# Altium PCB NB3000XN.PcbDoc (part 45 of 71)
Units mil, origin at the board's own origin, x right, y up, seen from the top; angles counter-clockwise.
Board outline 9527.56 x 6929.77 mil, 6 copper layers (Top Layer, GND+SHIELD, MidLayer1, MidLayer2, P2 - 3V3+5V0, Bottom Layer), stack 62.375 mil thick; 832 components, 1027 nets, 4655 pads, 4981 vias.
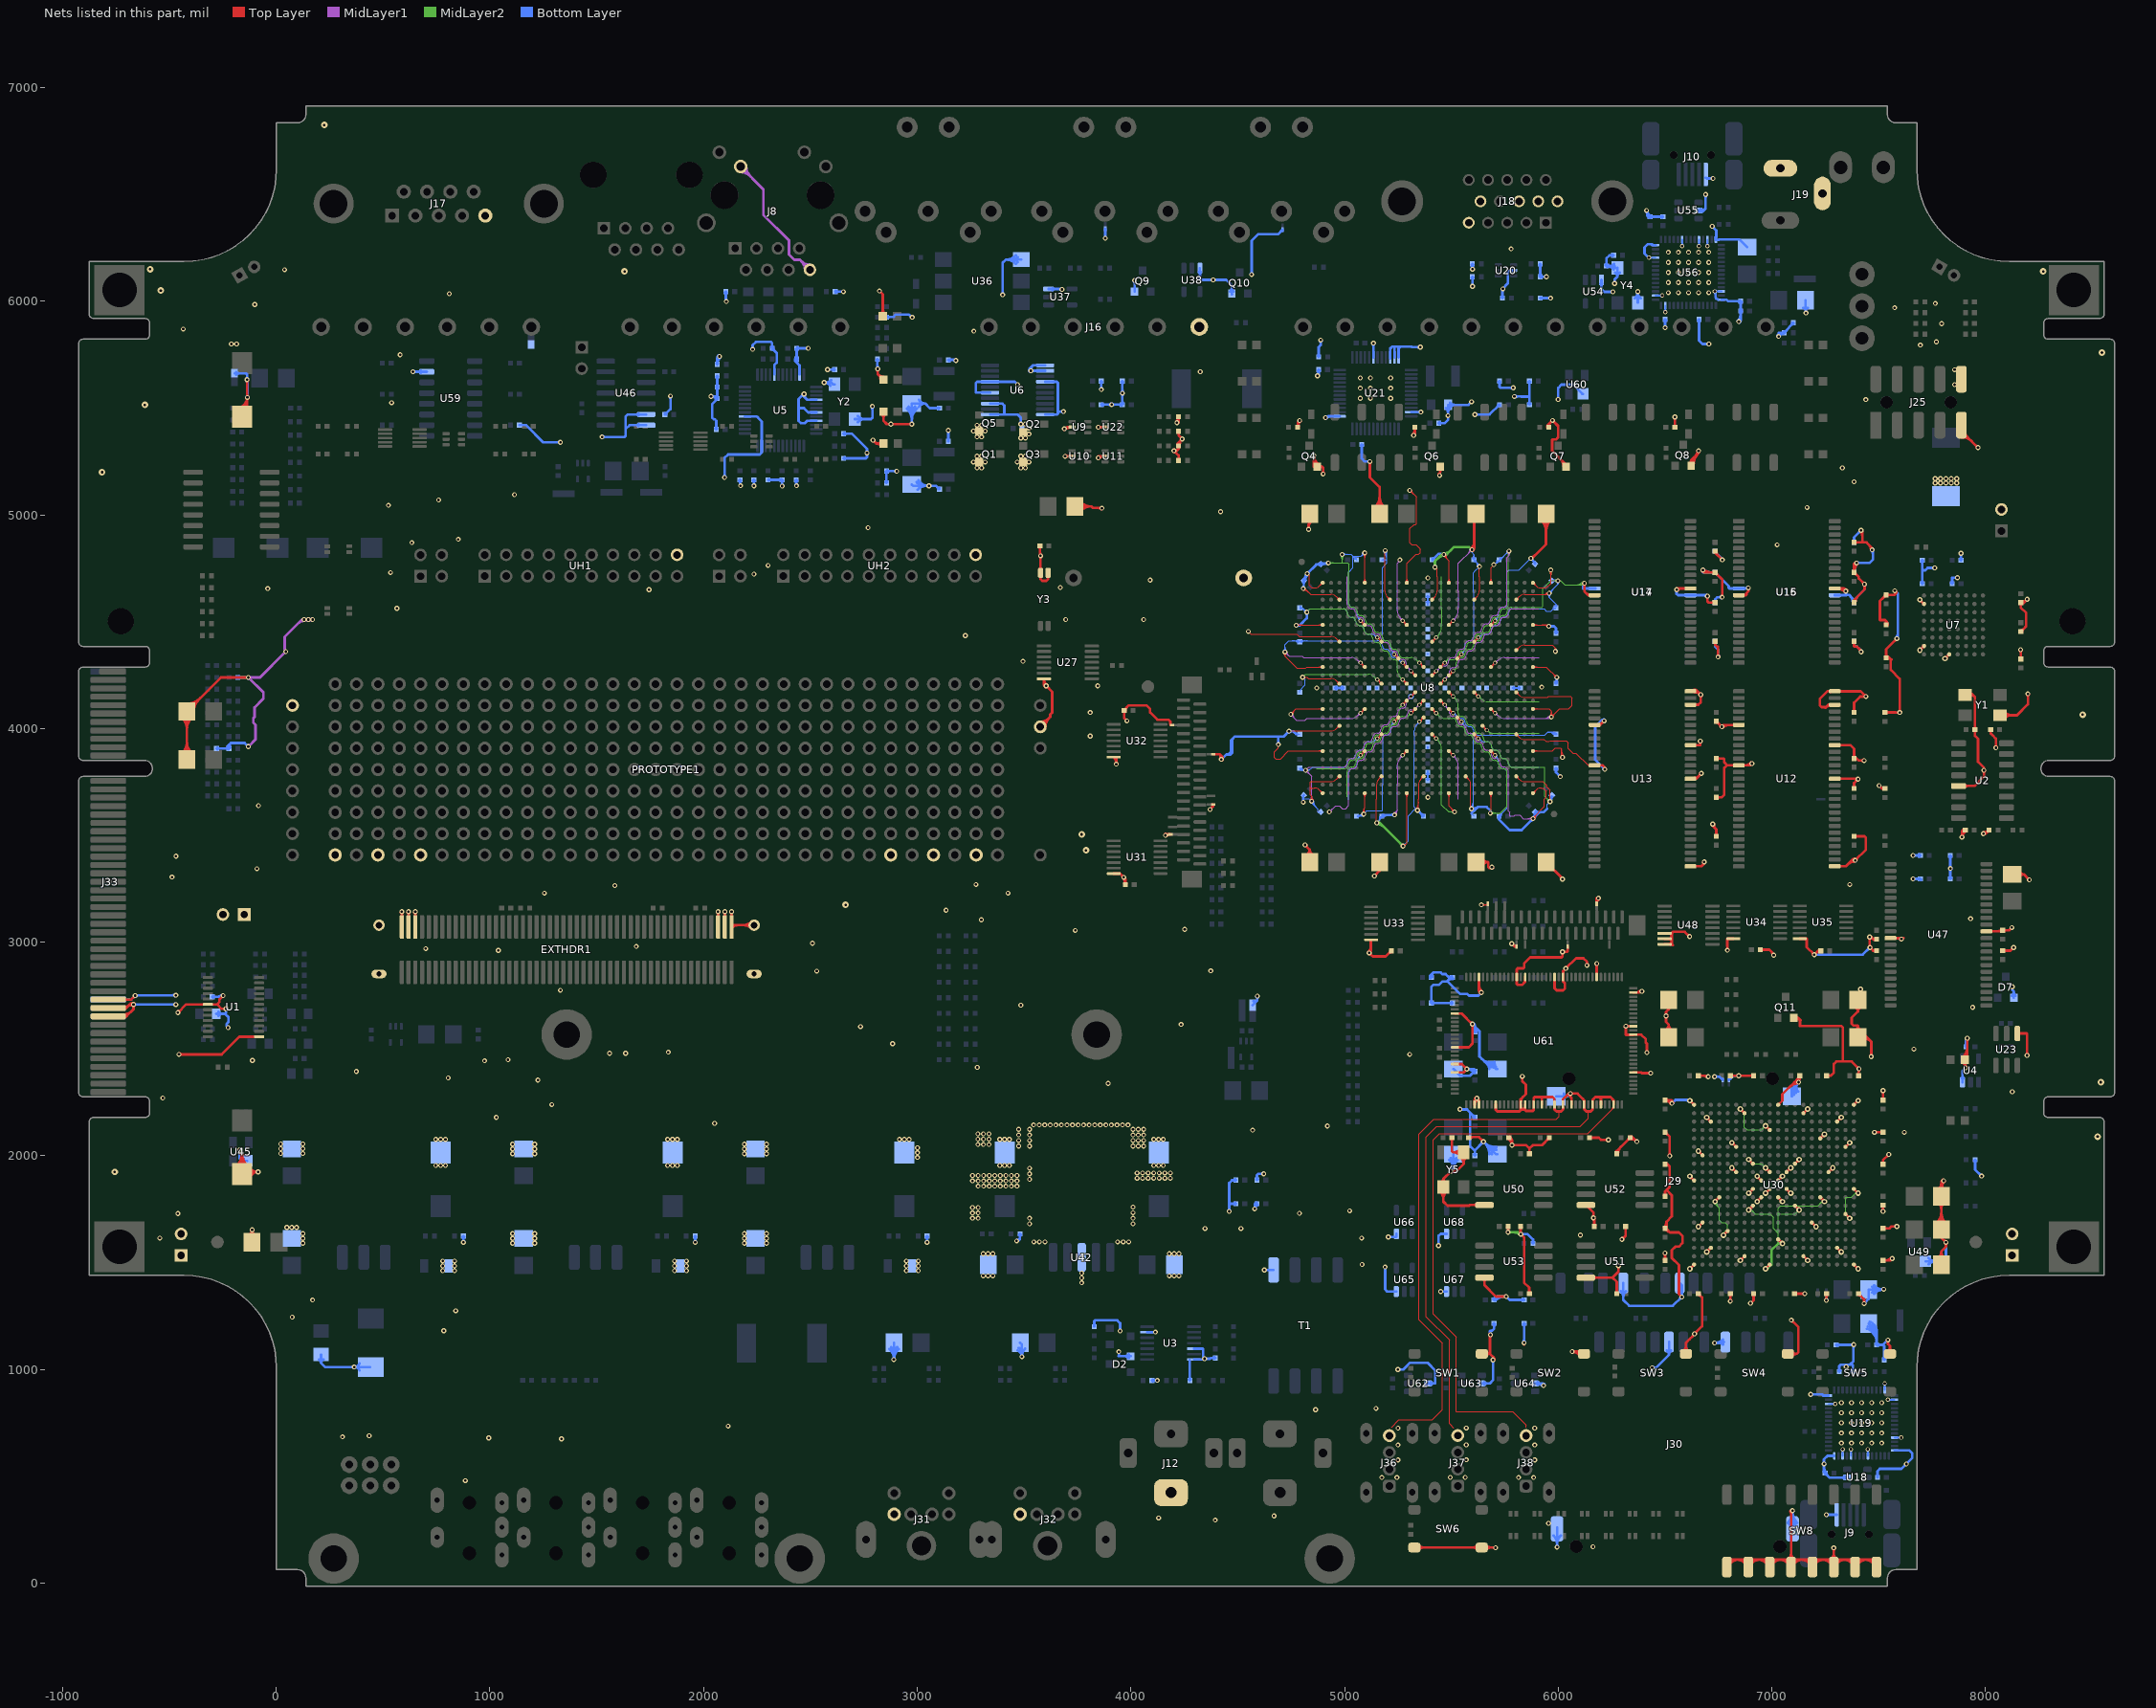
[diagram p49: the nets of this part, all layers, seen from the top]

## Via types
v1: diameter 23, hole 11.81, Top Layer to Bottom Layer, 3672 vias
v2: diameter 26, hole 11.81, Top Layer to Bottom Layer, 461 vias
v3: diameter 19, hole 11.81, Top Layer to Bottom Layer, tented both sides, 396 vias
v4: diameter 23.62, hole 11.81, Top Layer to Bottom Layer, 288 vias
v5: diameter 20, hole 11.81, Top Layer to Bottom Layer, 91 vias
v6: diameter 23, hole 11.81, Top Layer to Bottom Layer, tented both sides, 50 vias
v7: diameter 31, hole 11.81, Top Layer to Bottom Layer, 15 vias
v8: diameter 27.56, hole 11.81, Top Layer to Bottom Layer, tented both sides, 4 vias
v9: diameter 29, hole 11.81, Top Layer to Bottom Layer, 3 vias
v10: diameter 21, hole 11.81, Top Layer to Bottom Layer, 1 vias

## Nets (pads, with @x,y where several pads share a name; then routed paths per layer and width w, separated by ;. In a path a pad name is that pad's centre, name@x,y a point inside that pad or via, vN(x,y) a via of type N, cw(c..) or ccw(c..) an arc to the next point about the centre after c; other vN are vias at no path point) (continued)
GND: (continued)
  Bottom Layer w12: J33.B38@-785.98,2731.6 -678.25,2731.6 v1(-659.81,2750.04) -658.04,2751.81 v1(-470,2751.81) ; J33.B38@-711.58,2726.1 cw(c-698.3,2712.82) -698.3,2731.6 cw(c-698.3,2750.38) J33.B38@-711.58,2737.1 ; v1(-668.14,2708.37) -667.96,2708.19 v1(-470,2708.19) ; v1@-665.31,2750.04 cw(c-678.59,2750.04) -669.2,2740.65 cw(c-659.81,2731.26) v1@-659.81,2744.54 ; v1@-664.25,2704.49 cw(c-655.31,2695.55) -655.31,2708.19 ; v1@-664.25,2712.26 ccw(c-654.42,2722.1) -654.42,2708.19 ; v1@-655.92,2746.15 cw(c-642.26,2732.49) -642.26,2751.81 ; v1@-473.89,2704.3 ccw(c-483.28,2694.91) -483.28,2708.19 ccw(c-483.28,2721.47) v1@-473.89,2712.08 ; v1@-473.89,2747.92 ccw(c-483.28,2738.53) -483.28,2751.81 ccw(c-483.28,2765.09) v1@-473.89,2755.7 ; C21.2@-299.33,2745 -263.81,2745 -259.81,2749 -258.81,2750.04 v1(-248.48,2750.04) ; C21.2@-295.22,2740.89 cw(c-285.3,2730.97) -285.3,2745 ; C21.2@-295.22,2749.11 ccw(c-285.3,2759.03) -285.3,2745 ; C20.2@-280.63,2665 -239.81,2665 ; C13.2@-279.33,3906.82 C7.2@-220.67,3906.82 -220.67,3924.33 -212.63,3932.37 ; C13.2@-275.22,3902.71 cw(c-265.3,3892.79) -265.3,3906.82 ; C13.2@-275.22,3910.93 ccw(c-265.3,3920.85) -265.3,3906.82 ; -273.92,2745 ccw(c-273.92,2775.49) v1@-252.36,2753.93 ; C20.2@-270.95,2655.32 cw(c-247.59,2631.96) -247.59,2665 cw(c-247.59,2698.04) C20.2@-270.95,2674.68 ; v1@-238.36,2684.49 cw(c-247.75,2675.1) -234.48,2675.1 cw(c-221.2,2675.1) v1@-230.59,2684.49 ; v1(-234.48,2688.37) -234.48,2670.33 -239.81,2665 ; C7.2@-226.03,3903.73 cw(c-213.41,3910.99) -223.71,3921.29 ; v1(-225,2600) -233,2608 -233,2616.59 ; C7.2@-224.78,3902.71 ccw(c-234.7,3892.79) -234.7,3906.82 ccw(c-234.7,3920.85) -224.78,3910.93 ccw(c-234.7,3920.85) -220.67,3920.85 ccw(c-206.64,3920.85) C7.2@-216.56,3910.93 ; v1@-223.88,2605.38 cw(c-221.55,2616.59) -233,2616.59 ; C7.2@-215.63,3909.71 cw(c-199.33,3919.08) -212.63,3932.37 ; NT1.2@-194.76,5662.8 -142.79,5662.79 -136.48,5656.48 v1(-136.48,5633.37) -134.81,5631.71 v1(-134.81,5550.04) ; NT1.2@-187.87,5655.9 cw(c-171.23,5639.26) -171.23,5662.79 cw(c-171.23,5686.33) NT1.2@-187.87,5669.69 ; C18.2@-179.33,4239.55 -130.65,4239.54 v1(-130.48,4239.37) ; C18.2@-175.22,4235.44 cw(c-165.3,4225.52) -165.3,4239.54 ; C18.2@-175.22,4243.65 ccw(c-165.3,4253.57) -165.3,4239.54 ; v1(-171.14,2028.04) -171.14,1986.14 -161.69,1976.69 U45.1@-135.93,1976.69 ; -144.16,4239.54 cw(c-144.16,4225.69) v1@-134.36,4235.49 ; -143.34,4239.54 ccw(c-143.34,4252.24) v1@-134.36,4243.26 ; v1@-140.36,5629.49 cw(c-153.78,5616.07) -134.81,5616.07 ; v1@-140.36,5637.26 ccw(c-149.75,5646.65) -136.48,5646.65 ccw(c-123.2,5646.65) v1@-132.59,5637.26 ; v1@-138.7,5553.93 ccw(c-148.09,5563.32) -134.81,5563.32 ccw(c-121.53,5563.32) v1@-130.92,5553.93 ; v1@-135.98,3915.37 ccw(c-149.25,3915.37) -139.86,3924.76 ccw(c-130.48,3934.15) v1@-130.48,3920.87 ; v1(-130.48,3915.37) -147.48,3932.37 -212.63,3932.37 ; R111.2@199.3,1046.74 cw(c191.56,1030) 210,1030 ; R111.2@210,1069.88 210,1030 ; R111.2@220.7,1046.74 ccw(c228.44,1030) 210,1030 ; v1@361.3,1007.82 ccw(c351.91,998.43) 351.91,1011.71 ccw(c351.91,1024.99) v1@361.3,1015.6 ; v1@369.08,1007.82 cw(c378.72,998.18) 378.72,1011.81 ; v1@369.08,1015.6 ccw(c378.22,1024.74) 378.22,1011.81 ; C87.2@390.77,995.28 ccw(c365.19,983.76) v1@365.19,1011.81 ; C87.2@390.77,1028.34 cw(c365.19,1039.86) v1@365.19,1011.81 ; C87.2@439.24,1011.81 v1@365.19,1011.81 ; v4(639.92,5670.08) U59.15@704.59,5670.08 ; v4@644.03,5665.97 cw(c653.95,5656.05) 653.95,5670.08 cw(c653.95,5684.11) v4@644.03,5674.19 ; U59.15@677.44,5664.58 ccw(c664.16,5651.3) 664.16,5670.08 ccw(c664.16,5688.86) U59.15@677.44,5675.58 ; v1@872.29,1599.08 ccw(c862.9,1608.47) 876.18,1608.47 ccw(c889.46,1608.47) v1@880.07,1599.08 ; R206.2@872.42,1620.75 cw(c863.34,1611.67) 876.18,1611.67 cw(c889.02,1611.67) R206.2@879.94,1620.75 ; v1(876.18,1595.19) R206.2@876.18,1625 ; C151.2@1137.78,5420.08 1169.92,5420.08 1250,5340 v1(1330,5340) ; v1@1326.11,5336.11 ccw(c1316.72,5326.72) 1316.72,5340 ccw(c1316.72,5353.28) v1@1326.11,5343.89 ; v1(1525,5365) 1630,5365 1635,5370 1635,5401.16 ; v1@1528.89,5361.11 cw(c1538.28,5351.72) 1538.28,5365 cw(c1538.28,5378.28) v1@1528.89,5368.89 ; U46.7@1695.94,5415.97 ccw(c1686.02,5406.05) 1686.02,5420.08 ccw(c1686.02,5434.11) U46.7@1695.94,5424.19 ; U46.6@1695.94,5465.97 ccw(c1686.02,5456.05) 1686.02,5470.08 ccw(c1686.02,5484.11) U46.6@1695.94,5474.19 ; U46.7@1731.54,5420.08 1653.92,5420.08 1635,5401.16 ; U46.6@1731.54,5470.08 1645.08,5470.08 1635,5460 1635,5401.16 ; C152.1@1819.33,5470 1845.19,5495.86 v1(1845.19,5556.71) ; C152.1@1819.33,5475.81 ccw(c1819.33,5489.84) 1829.25,5479.92 ccw(c1839.17,5470) C152.1@1825.14,5470 ; v1@1841.3,5552.82 cw(c1831.91,5543.43) 1845.19,5543.43 cw(c1858.47,5543.43) v1@1849.08,5552.82 ; v1@1957.29,1598.89 ccw(c1947.9,1608.28) 1961.18,1608.28 ccw(c1974.46,1608.28) v1@1965.07,1598.89 ; R204.2@1957.42,1620.75 cw(c1948.34,1611.67) 1961.18,1611.67 cw(c1974.02,1611.67) R204.2@1964.94,1620.75 ; v1(1961.18,1595) R204.2@1961.18,1625 ; v1@2038.89,5551.11 cw(c2048.28,5541.72) 2048.28,5555 cw(c2048.28,5568.28) v1@2038.89,5558.89 ; 2052.94,5531.08 ccw(c2039.51,5544.51) R52.2@2058.5,5544.51 ; C50.1@2055.22,5404.11 ccw(c2045.3,5414.03) 2059.33,5414.03 ccw(c2073.36,5414.03) C50.1@2063.44,5404.11 ; C50.1@2059.33,5400 2059.33,5440.37 2052,5447.71 2048.52,5447.71 2040.19,5456.04 2040.19,5518.33 2063.82,5541.96 R52.2@2063.82,5545 ; R52.2@2059.49,5542.4 ccw(c2035,5524.9) v1(2035,5555) 2053.82,5555 R52.2@2063.82,5545 ; R52.2@2060.06,5549.25 ccw(c2050.98,5558.33) 2063.82,5558.33 ccw(c2076.66,5558.33) R52.2@2067.58,5549.25 ; R51.2@2060.06,5594.08 cw(c2050.98,5585) 2063.82,5585 ; R51.2@2060.06,5602.59 ccw(c2050.98,5611.67) 2063.82,5611.67 ccw(c2076.66,5611.67) R51.2@2067.58,5602.59 ; R47.2@2060.06,5647.41 cw(c2050.98,5638.33) 2063.82,5638.33 cw(c2076.66,5638.33) R47.2@2067.58,5647.41 ; R46.2@2060.06,5709.25 ccw(c2050.98,5718.33) 2063.82,5718.33 ccw(c2076.66,5718.33) R46.2@2067.58,5709.25 ; 2063.82,5585 cw(c2076.66,5585) R51.2@2067.58,5594.08 ; R47.2@2063.82,5651.67 R51.2@2063.82,5598.33 R52.2@2063.82,5545 ; R46.2@2063.82,5703.47 cw(c2111.53,5703.47) v1@2078.35,5737.76 ; R46.2@2063.82,5705 2063.82,5731.04 2066.15,5733.37 ; 2063.82,5731.79 cw(c2084.13,5731.79) v1@2070,5746.38 ; v1(2074.52,5741.71) 2066.15,5733.37 ; v1(2074.52,5741.71) 2066.19,5733.37 ; v1@2094.64,5179.08 ccw(c2085.25,5188.47) 2098.52,5188.47 ccw(c2111.8,5188.47) v1@2102.41,5179.08 ; v1(2098.52,5175.19) 2098.52,5266.37 2115.19,5283.04 2263.62,5283.04 2272.28,5291.71 U5.11@2272.28,5322.68 2272.28,5437.72 2252.85,5457.15 ; C43.2@2100.22,6040.89 cw(c2090.3,6030.97) 2104.33,6030.97 cw(c2118.36,6030.97) C43.2@2108.44,6040.89 ; 2104.33,6018.42 ccw(c2126.23,6018.42) v1@2110.75,6002.93 ; C43.2@2104.33,6045 2104.33,6001.57 v1(2106.86,5999.04) ; R45.2@2166.24,5160.06 cw(c2157.16,5150.98) 2170,5150.98 cw(c2182.84,5150.98) R45.2@2173.76,5160.06 ; R45.2@2170,5157.69 ccw(c2194.17,5157.69) v1@2177.08,5140.6 ; R45.2@2170,5163.82 2170,5139.71 2170.19,5139.71 v1(2173.19,5136.71) ; U5.17@2193.54,5460.47 2249.53,5460.47 2252.85,5457.15 ; v1@2226.11,5778.89 ccw(c2216.72,5788.28) 2230,5788.28 ccw(c2243.28,5788.28) v1@2233.89,5778.89 ; v1(2230,5775) 2230,5795 2245,5810 2315,5810 2321.18,5803.82 R56.1@2321.18,5780 2342.5,5758.68 2342.5,5712.35 2331.34,5701.19 U5.29@2331.34,5657.32 ; v1@2231.97,5140.26 ccw(c2222.23,5150) 2236,5150 ; R44.2@2232.24,5160.06 cw(c2223.16,5150.98) 2236,5150.98 cw(c2248.84,5150.98) R44.2@2239.76,5160.06 ; v1@2235.71,5136.52 2235.86,5136.52 v1@2236,5136.52 ; 2236,5149.31 ccw(c2248.79,5149.31) v1@2239.75,5140.26 ; R44.2@2236,5163.82 v1@2236,5136.52 ; v1@2236.67,5135.56 v1(2235.86,5136.37) v1@2236,5136.52 ; 2255,5455 2252.85,5457.15 ; 2267.34,5286.76 ccw(c2255.38,5298.72) U5.11@2272.28,5299.15 ; R43.2@2302,5163.82 R42.2@2368,5163.82 v1(2368,5135) ; R43.2@2306.25,5160.06 cw(c2315.33,5150.98) 2315.33,5163.82 cw(c2315.33,5176.66) R43.2@2306.25,5167.58 ; R56.1@2317.42,5784.25 ccw(c2308.34,5793.33) 2321.18,5793.33 ccw(c2334.02,5793.33) R56.1@2324.94,5784.25 ; R56.1@2321.18,5774.19 cw(c2321.18,5760.16) R56.1@2331.1,5770.08 ; R56.1@2326.5,5779.51 ccw(c2338.15,5779.51) R56.1@2329.91,5771.27 ; R42.2@2363.75,5160.06 ccw(c2354.67,5150.98) 2354.67,5163.82 ccw(c2354.67,5176.66) R42.2@2363.75,5167.58 ; v1@2364.11,5138.89 ccw(c2354.72,5148.28) 2368,5148.28 ccw(c2381.28,5148.28) v1@2371.89,5138.89 ; R42.2@2364.24,5160.06 cw(c2355.16,5150.98) 2368,5150.98 cw(c2380.84,5150.98) R42.2@2371.76,5160.06 ; R41.2@2430.24,5160.06 cw(c2421.16,5150.98) 2434,5150.98 cw(c2446.84,5150.98) R41.2@2437.76,5160.06 ; R41.2@2430.73,5160.06 cw(c2420.42,5149.75) 2435,5149.75 ; C44.2@2430.8,5733.82 ccw(c2440.39,5726.3) 2431.77,5717.68 ; v1@2431.3,5140.6 ccw(c2422.37,5149.53) 2435,5149.53 ; C44.2@2431.56,5734.11 ccw(c2421.64,5744.03) 2435.67,5744.03 ccw(c2449.7,5744.03) C44.2@2439.78,5734.11 ; C47.1@2431.56,5775.89 cw(c2421.64,5765.97) 2435.67,5765.97 cw(c2449.7,5765.97) 2439.78,5775.89 cw(c2449.7,5765.97) 2449.7,5780 ; R41.2@2434,5152.86 ccw(c2451.34,5152.86) 2439.08,5140.6 cw(c2448.93,5150.44) 2435,5150.44 ; 2435,5152.2 cw(c2446.11,5152.2) R41.2@2438.25,5160.06 ; C47.1@2439.78,5784.11 ccw(c2449.7,5794.03) 2449.7,5780 ; C44.2@2440.24,5726.41 ccw(c2451.11,5717.88) 2441.34,5708.11 ; 2445,5485 2445,5455 ; U5.35@2449.45,5657.32 2449.45,5700 2435.67,5713.78 C44.2@2435.67,5730 C47.1@2435.67,5775.04 ; v4@2464.19,5566.71 cw(c2450.16,5566.71) 2460.08,5556.79 cw(c2470,5546.87) v4@2470,5560.9 ; v4@2475.21,5564.14 ccw(c2489.68,5557.02) 2478.28,5545.62 ; v1@2484.23,5780 C47.1@2440.63,5780 ; v1@2486.11,5776.11 ccw(c2476.72,5766.72) 2476.72,5780 ccw(c2476.72,5793.28) v1@2486.11,5783.89 ; U5.45@2528.19,5440.79 2485.79,5440.79 2475,5430 2455,5430 2445,5440 2445,5455 ; U5.43@2528.19,5480.16 2489.84,5480.16 2470,5500 2445,5500 ; U5.40@2528.19,5539.21 2484.68,5539.21 2470,5553.9 v4(2470,5566.71) 2445,5541.71 2445,5500 ; v4@2569.11,5615.89 cw(c2579.03,5605.97) 2579.03,5620 cw(c2579.03,5634.03) v4@2569.11,5624.11 ; v4@2571.46,5620 ccw(c2571.46,5656.54) Y2.4@2597.3,5630.7 ; v4(2580,5680) C45.1@2614.33,5680 C45.1@2612.5,5680 ; v4@2584.11,5675.89 cw(c2594.03,5665.97) 2594.03,5680 cw(c2594.03,5694.03) v4@2584.11,5684.11 ; Y2.4@2594.39,5603.91 ccw(c2565,5585.11) v4(2565,5620) 2596.5,5620 2605,5611.5 Y2.4@2612.5,5611.5 ; C45.1@2610.22,5675.89 ccw(c2600.3,5665.97) 2600.3,5680 ccw(c2600.3,5694.03) C45.1@2610.22,5684.11 ; C48.1@2615.67,6045 v1(2655,6045) ; C48.1@2619.78,6040.89 cw(c2629.7,6030.97) 2629.7,6045 cw(c2629.7,6059.03) C48.1@2619.78,6049.11 ; C51.1@2655.67,5265 2760,5265 2765,5270 v1(2765,5290) 2765,5310 2695,5380 C46.1@2655.67,5380 ; C51.1@2659.78,5260.89 cw(c2669.7,5250.97) 2669.7,5265 cw(c2669.7,5279.03) C51.1@2659.78,5269.11 ; C46.1@2659.78,5375.89 cw(c2669.7,5365.97) 2669.7,5380 cw(c2669.7,5394.03) C46.1@2659.78,5384.11 ; Y2.2@2707.5,5448.5 2783.5,5448.5 2790.19,5455.19 v1(2790.19,5508.37) ; Y2.2@2722.7,5433.3 cw(c2759.41,5396.59) 2759.41,5448.5 cw(c2759.41,5500.41) Y2.2@2722.7,5463.7 ; v1@2761.11,5286.11 cw(c2751.72,5276.72) 2765,5276.72 cw(c2778.28,5276.72) v1@2768.89,5286.11 ; v1@2761.11,5293.89 ccw(c2751.72,5303.28) 2765,5303.28 ccw(c2778.28,5303.28) v1@2768.89,5293.89 ; v1@2786.3,5504.49 cw(c2776.91,5495.1) 2790.19,5495.1 cw(c2803.47,5495.1) v1@2794.08,5504.49 ; R64.1@2810.06,5725.75 cw(c2800.98,5716.67) 2813.82,5716.67 cw(c2826.66,5716.67) R64.1@2817.58,5725.75 ; 2813.82,5699.96 ccw(c2831.78,5699.96) v1@2819.08,5687.26 ; R64.1@2813.82,5730 2813.82,5684.75 v1(2815.19,5683.37) ; R61.2@2852.42,5154.25 ccw(c2843.34,5163.33) 2856.18,5163.33 ccw(c2869.02,5163.33) R61.2@2859.94,5154.25 ; R65.2@2852.42,5200.75 cw(c2843.34,5191.67) 2856.18,5191.67 cw(c2869.02,5191.67) R65.2@2859.94,5200.75 ; R61.2@2856.18,5150 R65.2@2856.18,5205 2904.23,5205 v1(2904.52,5204.71) ; R60.1@2856.18,5926 2887.63,5926 2900,5938.37 2915.19,5938.37 2960.19,5938.37 2973.52,5925.04 v1(2976.52,5925.04) ; R65.2@2859.94,5201.24 cw(c2869.02,5192.16) 2869.02,5205 cw(c2869.02,5217.84) R65.2@2859.94,5208.76 ; R60.1@2859.94,5922.24 cw(c2869.02,5913.16) 2869.02,5926 cw(c2869.02,5938.84) R60.1@2859.94,5929.76 ; C62.2@2869.74,1096.21 cw(c2825.12,1046.38) v1@2892.01,1046.38 ; C62.2@2877.75,1105.14 cw(c2849.17,1073.24) 2892.01,1073.24 cw(c2934.84,1073.24) C62.2@2906.27,1105.14 ; v1@2886.3,1050.26 ccw(c2872.52,1064.04) 2892.01,1064.04 ; v1(2890.19,1046.37) 2892.01,1044.56 v1@2892.01,1046.37 ; 2890.54,5205 cw(c2890.54,5190.72) v1@2900.64,5200.82 ; 2891.95,5205 ccw(c2891.95,5217.28) v1@2900.64,5208.6 ; C62.2@2892.01,1125 v1@2892.01,1046.37 ; C62.2@2914.27,1096.21 ccw(c2958.9,1046.38) v1@2892.01,1046.38 ; C49.2@2951.4,5498.41 cw(c2894.44,5441.45) 2975,5441.45 cw(c3055.56,5441.45) C49.2@2998.6,5498.41 ; C49.2@2959.89,5506.9 cw(c2923.41,5470.42) 2975,5470.42 cw(c3026.59,5470.42) C49.2@2990.11,5506.9 ; 2962.01,5936.55 ccw(c2976.52,5951.06) v1@2976.52,5930.54 ; v1@2971.11,5428.89 ccw(c2961.72,5438.28) 2975,5438.28 ccw(c2988.28,5438.28) v1@2978.89,5428.89 ; C40.2@2975,5142.01 2980.63,5136.37 v1(3055.19,5136.37) ; v1(2975,5425) C49.2@2975,5522.01 3037.22,5522.01 ; C40.2@2996.27,5154.51 ccw(c3031.73,5180.11) 3031.73,5136.37 ; C40.2@3002.53,5118.41 cw(c3045.9,5075.04) v1@3045.9,5136.37 ; C40.2@3006,5161.54 ccw(c3055.19,5197.04) v1(3055.19,5136.37) ; C49.2@3007.71,5505.11 cw(c3037.22,5487.79) 3037.22,5522.01 ; C49.2@3007.71,5538.9 ccw(c3037.22,5556.22) 3037.22,5522.01 ; v1@3042.29,1598.89 ccw(c3032.9,1608.28) 3046.18,1608.28 ccw(c3059.46,1608.28) v1@3050.07,1598.89 ; R202.2@3042.42,1620.75 cw(c3033.34,1611.67) 3046.18,1611.67 cw(c3059.02,1611.67) R202.2@3049.94,1620.75 ; v1(3046.18,1595) R202.2@3046.18,1625 ; v1@3051.3,5132.49 ccw(c3041.91,5123.1) 3041.91,5136.37 ccw(c3041.91,5149.65) v1@3051.3,5140.26 ; v1@3059.08,5132.49 cw(c3068.47,5123.1) 3068.47,5136.37 cw(c3068.47,5149.65) v1@3059.08,5140.26 ; C42.1@3098.52,5120 ccw(c3084.49,5120) 3094.41,5129.92 ccw(c3104.33,5139.84) C42.1@3104.33,5125.81 ; C53.1@3100.22,5495.89 ccw(c3090.3,5485.97) 3090.3,5500 ccw(c3090.3,5514.03) C53.1@3100.22,5504.11 ; C42.1@3104.33,5120 3087.96,5136.37 v1(3055.19,5136.37) ; C53.1@3104.33,5500 3059.23,5500 3037.22,5522.01 ; C41.1@3145.67,5345 v1(3145.67,5395.67) ; C52.1@3145.67,5725 3147.09,5726.42 3177.58,5726.42 v1(3181,5723) ; C52.1@3149.78,5720.89 cw(c3163.13,5707.53) 3163.13,5726.42 ; 3159.46,5726.42 cw(c3159.46,5701.46) v1@3177.11,5719.11 ; U6.11@3341.06,5469.84 3407.86,5469.84 ; U6.13@3341.06,5521.02 3398.52,5521.02 3407.86,5511.69 3407.86,5469.84 ; U6.15@3341.06,5572.2 3275,5572.2 3275,5617.86 3280.52,5623.39 U6.17@3341.06,5623.39 3456.61,5623.39 v1(3470,5610) ; v1@3396.11,6033.89 ccw(c3386.72,6043.28) 3400,6043.28 ccw(c3413.28,6043.28) v1@3403.89,6033.89 ; v1(3400,6030) 3400,6180 3415,6195 ; U36.4@3461.44,6175.04 ccw(c3415,6131) 3415,6195 ; U36.4@3461.44,6214.96 cw(c3415,6259) 3415,6195 ; v1(3465.19,1602.04) 3472.04,1602.04 3481.18,1611.18 ; v1@3466.65,1607.34 ccw(c3470.62,1621.74) 3481.18,1611.18 ; C61.2@3469.39,1090.17 cw(c3456.85,1059.48) v1@3490,1059.48 ; U36.4@3470.15,6183.3 ccw(c3442.92,6157.48) 3442.92,6195 ccw(c3442.92,6232.52) U36.4@3470.15,6206.7 ; C61.2@3473.93,1101.28 cw(c3464.15,1077.35) 3490,1077.35 ; R208.2@3477.42,1630.75 cw(c3468.34,1621.67) 3481.18,1621.67 cw(c3494.02,1621.67) R208.2@3484.94,1630.75 ; v1@3481.11,5429.09 ccw(c3471.72,5438.47) 3485,5438.47 ccw(c3498.28,5438.47) v1@3488.89,5429.09 ; R208.2@3481.18,1635 3481.18,1611.18 ; C61.2@3482.01,1125 3490,1117.01 v1(3490,1060) ; v1(3485,5425.2) 3485,5455 3470.16,5469.84 3407.86,5469.84 ; v1@3486.11,1063.89 ccw(c3476.72,1073.28) 3490,1073.28 ccw(c3503.28,1073.28) v1@3493.89,1063.89 ; U36.4@3487.48,6195 3415,6195 ; v1@3490,1059.8 cw(c3543.28,1059.8) C61.2@3505.6,1097.47 ; v1@3526.02,5671.7 cw(c3539,5678.07) 3528.78,5688.29 ; v1@3527.97,5678.46 ccw(c3518.58,5687.84) 3531.86,5687.84 ccw(c3545.14,5687.84) 3535.75,5678.46 ccw(c3545.14,5687.84) 3545.14,5674.57 ccw(c3545.14,5661.29) v1@3535.75,5670.68 ; v1@3536.79,5676.99 cw(c3554.91,5685.89) 3540.64,5700.16 ; U6.10@3598.94,5469.84 3653.52,5469.84 3658.52,5474.84 3658.52,5483.37 ; U6.4@3598.94,5623.39 3653.52,5623.39 3658.52,5618.39 3658.52,5483.37 ; U6.2@3598.94,5674.57 v1(3531.86,5674.57) 3531.86,5691.37 3540.64,5700.16 ; U6.1@3598.94,5700.16 3540.64,5700.16 ; U37.3@3614.88,6057.4 3675.83,6057.4 v1(3677.52,6055.71) v1@3680,6058.18 ; U37.3@3632.77,6053.29 cw(c3642.69,6043.37) 3642.69,6057.4 cw(c3642.69,6071.43) U37.3@3632.77,6061.51 ; 3660.16,6057.4 cw(c3660.16,6038.34) v1@3673.64,6051.82 ; 3671.25,5483.37 ccw(c3671.25,5497.32) v1@3681.11,5487.46 ; 3672.19,5483.37 cw(c3672.19,5470.76) v1@3681.11,5479.68 ; v1@3681.86,5483.37 3658.52,5483.37 ; R36.2@3829,1201.18 3829,1227.04 3831.96,1230 3937.04,1230 3950,1217.04 v1(3950,1180) ; C243.2@3857.62,5622.07 cw(c3847.7,5612.15) 3861.73,5612.15 cw(c3875.75,5612.15) C243.2@3865.83,5622.07 ; v1@3857.97,5590.79 ccw(c3848.9,5599.86) 3861.73,5599.86 ; C244.2@3861.72,5516.18 3910,5516.18 C259.2@3960.39,5516.18 v1(3960.39,5570.19) C229.2@3960.39,5626.18 ; 3861.73,5600.5 ccw(c3875.45,5600.5) v1@3865.75,5590.79 ; C243.2@3861.72,5626.18 3861.73,5586.9 3861.73,5586.71 v1@3861.86,5586.71 ; C244.2@3865.83,5512.07 cw(c3875.75,5502.15) 3875.75,5516.18 cw(c3875.75,5530.21) C244.2@3865.83,5520.29 ; v1@3880,6293.14 NT47.1@3880,6340 ; 3896.25,5516.18 ccw(c3896.25,5530.12) v1@3906.11,5520.26 ; 3897.19,5516.18 cw(c3897.19,5503.56) v1@3906.11,5512.48 ; v1@3913.89,5512.48 cw(c3922.81,5503.56) 3922.81,5516.18 ; v1@3913.89,5520.26 ccw(c3923.75,5530.12) 3923.75,5516.18 ; v1(3943.52,1083.37) 3943.52,1062.71 3943.22,1062.4 D2.1@3999.21,1062.4 ; C259.2@3956.28,5512.07 ccw(c3946.36,5502.15) 3946.36,5516.18 ccw(c3946.36,5530.21) 3956.28,5520.29 ccw(c3946.36,5530.21) 3960.39,5530.21 ccw(c3974.42,5530.21) C259.2@3964.5,5520.29 ; C229.2@3956.28,5622.07 cw(c3946.36,5612.15) 3960.39,5612.15 cw(c3974.42,5612.15) C229.2@3964.5,5622.07 ; v1@3956.5,5566.3 cw(c3947.11,5556.92) 3960.39,5556.92 cw(c3973.66,5556.92) v1@3964.28,5566.3 ; v1@3956.5,5574.08 ccw(c3947.11,5583.47) 3960.39,5583.47 ccw(c3973.66,5583.47) v1@3964.28,5574.08 ; D2.1@3989.94,1054.12 ccw(c3969.94,1034.11) 3969.94,1062.4 ccw(c3969.94,1090.69) D2.1@3989.94,1070.69 ; v1@4013.71,6093.71 cw(c4004.32,6084.32) 4017.6,6084.32 cw(c4030.88,6084.32) v1@4021.49,6093.71 ; Q9.3@4017.6,6045.79 v1(4017.6,6097.6) ; U3.13@4076.5,1174.41 4090.19,1174.41 4090.19,1175.04 v1@4112.52,1175.04 ; C37.1@4098.67,949 v1(4124,949) ; C37.1@4102.78,944.89 cw(c4112.7,934.97) 4112.7,949 cw(c4112.7,963.03) C37.1@4102.78,953.11 ; v1@4120.11,945.11 ccw(c4110.72,935.72) 4110.72,949 ccw(c4110.72,962.28) v1@4120.11,952.89 ; R34.2@4272.4,953.25 ccw(c4263.32,962.33) 4276.16,962.33 ccw(c4289,962.33) R34.2@4279.92,953.25 ; R34.2@4276.16,949 U3.7@4276.16,1043.84 ; U3.7@4295,1046.46 4336.86,1046.46 4338.52,1048.12 v1@4338.52,1050.04 ; U3.5@4295,1097.64 4336.86,1097.64 4338.52,1095.97 v1@4338.52,1050.04 ; U38.3@4323.24,6155.12 4323.24,6125.04 4323.52,6124.76 4323.52,6103.71 4327.19,6100.04 4446.52,6100.04 4472.6,6073.97 Q10.3@4472.6,6035.79 4472.6,6033.37 Q10.3@4473.52,6033.37 ; R38.1@4390.75,1050.06 ccw(c4381.67,1040.98) 4381.67,1053.82 ccw(c4381.67,1066.66) R38.1@4390.75,1057.58 ; R38.1@4395,1053.82 4374.19,1053.82 4370.52,1050.15 4370.52,1050.04 v1(4345,1050.04) v1@4338.52,1050.04 ; v1(4423.52,3855.71) 4446.86,3879.04 4455,3879.04 ; v1@4423.52,3861.21 ccw(c4423.52,3874.49) 4432.91,3865.1 ccw(c4442.3,3855.71) v1@4429.02,3855.71 ; v1@4456.11,1743.89 ccw(c4446.72,1753.28) 4460,1753.28 ccw(c4473.28,1753.28) v1@4463.89,1743.89 ; v1(4460,1740) 4460,1775 ; Q10.3@4464.31,6045.06 ccw(c4444.31,6065.06) 4472.6,6065.06 ccw(c4500.88,6065.06) Q10.3@4480.88,6045.06 ; C216.2@4487.62,1772.07 ccw(c4477.7,1762.15) 4477.7,1776.18 ccw(c4477.7,1790.21) C216.2@4487.62,1780.29 ; C232.2@4487.62,1882.07 ccw(c4477.7,1872.15) 4477.7,1886.18 ccw(c4477.7,1900.21) C232.2@4487.62,1890.29 ; C216.2@4491.72,1776.18 4461.18,1776.18 4460,1775 ; C232.2@4491.72,1886.18 4473.52,1886.18 4460,1872.65 4460,1775 ; v1@4561.3,6129.12 ccw(c4551.91,6138.51) 4565.19,6138.51 ccw(c4578.47,6138.51) v1@4569.08,6129.12 ; v1@4565.19,6125.04 v1(4565.19,6125.23) 4565.19,6283.37 4595.19,6313.37 4688.37,6313.37 NT48.1@4710,6335 ; NT44.1@4569.76,2705.08 4592,2727.31 ; NT44.1@4573.91,2724.15 ccw(c4580.7,2738.61) 4592,2727.31 ; v1@4579.6,1749.73 cw(c4603.15,1749.73) C252.2@4592.91,1770.94 ; C252.2@4579.6,1768.85 cw(c4593.92,1768.85) C252.2@4587.7,1781.75 ; v1@4580,1752.4 v1(4579.6,1752.03) 4579.6,1765.39 C252.2@4590.39,1776.18 ccw(c4606.21,1760.35) v1@4584.85,1753.67 ; C251.2@4586.28,1890.29 ccw(c4576.36,1900.21) 4590.39,1900.21 ccw(c4604.42,1900.21) C251.2@4594.5,1890.29 ; v1@4588.11,2744.11 cw(c4578.72,2734.72) 4592,2734.72 cw(c4605.28,2734.72) v1@4595.89,2744.11 ; C251.2@4590.39,1886.18 4590.39,1910 4596.39,1916 v1(4622,1916) ; v1(4592,2748) 4592,2727.31 ; v1@4618.11,1912.11 ccw(c4608.72,1902.72) 4608.72,1916 ccw(c4608.72,1929.28) v1@4618.11,1919.89 ; v1(4625,1466) T1.1@4668,1466 ; v1@4686.3,3928.93 ccw(c4676.91,3938.32) 4690.19,3938.32 ccw(c4703.47,3938.32) v1@4694.08,3928.93 ; v1(4690.19,3925.04) 4690.19,3962.04 ; 4702.32,6327.32 cw(c4710,6319.64) NT48.1@4710,6330.5 ; v1@4734.69,3987.71 cw(c4721.41,3987.71) 4730.8,3978.32 cw(c4740.19,3968.93) v1@4740.19,3982.21 ; v1@4744.08,3983.82 cw(c4753.47,3974.43) 4753.47,3987.71 cw(c4753.47,4000.99) v1@4744.08,3991.6 ; 4765.19,3982.78 4773.52,3974.45 ; 4765.19,3983.04 4760.52,3987.71 v1(4740.19,3987.71) 4714.52,3962.04 4690.19,3962.04 ; v1(4773.52,4483.37) 4790.19,4483.37 ; v1@4777.41,4479.49 cw(c4786.8,4470.1) 4786.8,4483.37 cw(c4786.8,4496.65) v1@4777.41,4487.26 ; C310.2@4806.36,4696.51 ccw(c4792.44,4717.37) 4817.52,4717.37 4817.52,4699.61 C310.2@4809.59,4691.67 ; 4806.86,4500.04 4790.19,4483.37 ; 4806.92,3669.37 v1(4806.86,3655.37) 4806.86,3685.6 C327.2@4809.59,3688.33 ; v1@4809.59,4659.98 v1@4809.86,4659.71 ; C310.2@4817.52,4698.48 cw(c4845.4,4698.48) v1@4828.52,4720.66 ; v1@4819.64,4540.82 cw(c4810.25,4531.43) 4823.52,4531.43 cw(c4836.8,4531.43) v1@4827.41,4540.82 ; v1(4823.52,4544.71) 4823.52,4516.71 4790.19,4483.37 ; v1(4825.19,4725.04) 4866.86,4766.71 ; v1@4825.19,4730.54 ccw(c4825.19,4743.82) 4834.58,4734.43 ccw(c4843.97,4725.04) v1@4830.69,4725.04 ; 4867,4768 4888.3,4770.61 v1@4917.69,4774.2 ; v1@4869.64,5655.26 ccw(c4846.23,5678.67) C100.2@4879.33,5678.67 ; v1(4873.52,5651.37) 4874.52,5650.37 4875.33,5650.37 4879.33,5654.37 C100.2@4879.33,5680 ; C294.2@4873.91,4768.85 cw(c4875.69,4754.25) C294.2@4884.75,4765.83 ; C294.2@4874.85,4768.96 ccw(c4873.23,4782.22) C294.2@4883.75,4773.99 ; R116.1@4875.06,5744.25 ccw(c4865.98,5753.33) 4878.82,5753.33 ccw(c4891.66,5753.33) R116.1@4882.58,5744.25 ; C100.2@4875.22,5675.89 cw(c4865.3,5665.97) 4879.33,5665.97 cw(c4893.36,5665.97) C100.2@4883.44,5675.89 ; R116.1@4879.33,5739.49 R116.1@4878.82,5740 4878.82,5785 4888.52,5794.7 v1(4888.52,5818.37) ; v1@4884.64,5814.49 cw(c4875.25,5805.1) 4888.52,5805.1 cw(c4901.8,5805.1) v1@4892.41,5814.49 ; C294.2@4888.33,4770.41 4913.89,4770.41 v1@4917.69,4774.2 ; C294.2@4891.91,4774.99 ccw(c4900.13,4785.51) C294.2@4901.76,4772.25 ; C294.2@4892.44,4766.3 cw(c4902.36,4756.38) 4902.36,4770.41 cw(c4902.36,4784.44) C294.2@4892.44,4774.52 ; C294.2@4892.91,4766.83 cw(c4904.49,4757.78) C294.2@4902.7,4772.37 ; C294.2@4900.07,4770.41 ccw(c4900.07,4799.49) v1@4920.64,4778.93 ; v1(4910.86,5455.37) 4915.86,5460.37 4923.14,5460.37 4924.5,5461.73 U21.25@4977.68,5461.73 ; v1@4914.75,5451.49 cw(c4939.48,5426.75) 4939.48,5461.73 ; v1@4920.19,4778.43 cw(c4909.73,4786.61) 4911.34,4773.43 cw(c4912.96,4760.25) v1@4921.14,4770.71 ; C318.2@4956.93,4190 C302.2@4994.33,4190 ; C318.2@4961.04,4185.89 cw(c4970.96,4175.97) 4970.96,4190 cw(c4970.96,4204.03) C318.2@4961.04,4194.11 ; C302.2@4990.22,4185.89 ccw(c4980.3,4175.97) 4980.3,4190 ccw(c4980.3,4204.03) C302.2@4990.22,4194.11 ; C96.2@5076.56,5325.89 cw(c5066.64,5315.97) 5080.67,5315.97 cw(c5094.7,5315.97) C96.2@5084.78,5325.89 ; C96.2@5080.67,5330 5080.67,5264.33 5094.96,5250.04 v1(5118.86,5250.04) ; v1@5114.97,5246.15 ccw(c5105.58,5236.76) 5105.58,5250.04 ccw(c5105.58,5263.32) v1@5114.97,5253.93 ; v1@5131.3,5800.15 cw(c5121.99,5790.84) 5135.16,5790.84 ; U21.42@5135.16,5737.32 v1@5135.16,5804.01 ; 5135.16,5790.69 cw(c5148.55,5790.69) v1@5139.08,5800.15 ; C330.2@5177.6,3594.88 ccw(c5182.35,3602.22) 5188.52,3596.04 ; C330.2@5178.56,3585.89 cw(c5203.06,3561.39) 5203.06,3596.04 ; C330.2@5180.17,3589.01 cw(c5188.52,3587.57) 5188.52,3596.04 ; C330.2@5181.86,3589.37 5188.52,3596.04 ; v1(5190,1480) 5190,1375 5200,1365 5242.48,1365 U65.3@5242.6,1364.88 ; v1(5205,1620) 5240,1620 5242.6,1622.6 5242.6,1633.19 U66.3@5242.6,1634.88 ; U21.46@5213.9,5731.74 U21.46@5213.9,5737.32 5213.9,5778.9 5223.21,5788.21 5235,5788.21 ; v1@5230.64,3592.15 ccw(c5221.25,3582.76) 5221.25,3596.04 ccw(c5221.25,3609.32) v1@5230.64,3599.93 ; U21.47@5233.58,5737.32 5233.58,5786.79 5235,5788.21 ; v1(5234.52,3596.04) 5188.52,3596.04 ; v4(5250,1000) 5275,1000 5306.54,1031.54 5388.46,1031.54 5425,995 5425,935 U62.2@5392.24,935 ; U21.48@5253.27,5737.32 5253.27,5778.27 5263.21,5788.21 ; v4@5254.11,995.89 cw(c5264.03,985.97) 5264.03,1000 cw(c5264.03,1014.03) v4@5254.11,1004.11 ; U21.11@5312.32,5481.42 v1(5357.86,5481.37) v1(5357.86,5481.37) ; v1@5341.52,3612.54 cw(c5341.52,3599.26) 5350.91,3608.65 cw(c5360.3,3618.04) v1@5347.02,3618.04 ; v1(5341.52,3618.04) C333.2@5365.19,3594.37 ; 5344.48,5481.42 cw(c5344.48,5468) v1@5353.97,5477.49 ; 5344.68,5481.42 ccw(c5344.68,5494.55) v1@5353.97,5485.26 ; v4@5350.89,5780.89 ccw(c5340.97,5770.97) 5340.97,5785 ccw(c5340.97,5799.03) v4@5350.89,5789.11 ; v4(5355,5785) 5315.64,5785 5312.43,5788.21 5263.21,5788.21 ; C333.2@5359.25,3600.32 cw(c5348.93,3590) C333.2@5363.52,3590 ; C333.2@5359.81,3599.75 ccw(c5369.33,3609.28) C333.2@5369.33,3595.81 ; C333.2@5365.19,3590 C333.2@5369.33,3590 ; C193.2@5401.24,2832.14 cw(c5412.36,2837.94) C193.2@5403.49,2846.8 ; C192.2@5402.62,2719.11 ccw(c5392.7,2729.03) 5406.73,2729.03 ccw(c5420.75,2729.03) 5410.83,2719.11 ccw(c5420.75,2729.03) 5420.75,2715 ccw(c5420.75,2700.97) C192.2@5410.83,2710.89 ; C193.2@5402.62,2839.11 ccw(c5392.7,2849.03) 5406.73,2849.03 ccw(c5420.75,2849.03) C193.2@5410.83,2839.11 ; U62.2@5403.65,929.5 cw(c5416.93,916.22) 5416.93,935 cw(c5416.93,953.78) U62.2@5403.65,940.5 ; C193.2@5406.72,2835 5406.73,2850.04 5415.06,2858.37 ; C332.2@5410.67,4790 5411.97,4790 5438.68,4816.71 5463.29,4816.71 v1(5465,4815) ; C332.2@5410.67,4795.81 ccw(c5410.67,4812.98) 5422.81,4800.84 ; C193.2@5411.88,2837.69 cw(c5427.57,2845.86) 5415.06,2858.37 ; C332.2@5416.48,4790 cw(c5427.37,4790) C332.2@5419.67,4797.7 ; v1(5440,1580) 5440,1625 5450.09,1635.09 U68.3@5477.39,1635.09 ; C98.2@5440.67,5430 5469.37,5430 5484.37,5445 C99.1@5484.37,5515 5580,5515 v1(5594.54,5529.73) ; C98.2@5444.78,5425.89 cw(c5454.7,5415.97) 5454.7,5430 cw(c5454.7,5444.03) C98.2@5444.78,5434.11 ; v1@5445.12,1364.88 U67.3@5477.6,1364.88 U67.3@5477.48,1365 ; 5447.6,4816.71 cw(c5447.6,4797.6) v1@5461.11,4811.11 ; C99.1@5474.69,5500.4 cw(c5451.33,5477.04) 5484.37,5477.04 cw(c5517.41,5477.04) C99.1@5494.05,5500.4 ; U68.3@5477.6,1634.88 U68.3@5477.39,1635.09 ; U68.3@5478.38,1635.09 U68.3@5477.39,1635.09 ; 5481.48,2842.09 ccw(c5493.22,2853.83) C257.2@5502.23,2839.88 ; 5483.68,2820.2 cw(c5505.38,2798.5) C257.2@5505.39,2829.19 ; C341.2@5489.74,1980.49 cw(c5458.44,1939.52) 5510,1939.52 ; 5491.98,2831.58 ccw(c5501.47,2841.07) C257.2@5508.74,2829.8 ; C99.1@5494.05,5505.32 cw(c5517.41,5481.96) 5517.41,5515 cw(c5517.41,5548.04) C99.1@5494.05,5524.68 ; v1@5494.64,1931.93 ccw(c5457.54,1969.02) C341.2@5510,1969.02 ; C341.2@5497.03,1990.03 cw(c5476.98,1963.79) 5510,1963.79 cw(c5543.02,1963.79) C341.2@5522.97,1990.03 ; v1(5498.52,1928.04) 5510,1939.52 ; C258.2@5501.28,2710.89 ccw(c5491.36,2700.97) 5491.36,2715 ccw(c5491.36,2729.03) C258.2@5501.28,2719.11 ; v1@5503.12,1923.44 ccw(c5486.51,1940.05) 5510,1940.05 ; C258.2@5505.39,2715 C192.2@5406.72,2715 5406.73,2791.71 5415.06,2800.04 5441.86,2800.04 5458.52,2816.71 5480.19,2816.71 ; C257.2@5505.39,2835 5493.52,2835 5493.52,2830.04 ; C341.2@5510,2007.01 5510,1939.52 ; C340.2@5510,2407.01 5541.97,2375.04 5573.52,2375.04 5587.19,2375.04 5603.74,2391.59 5605.93,2391.59 C337.2@5610,2395.67 5599.29,2406.37 v1(5572.52,2406.37) cw(c5572.53,2361.42) C337.2@5605.71,2391.75 ; C341.2@5530.26,1980.49 ccw(c5561.56,1939.52) 5510,1939.52 ; v1(5540.19,2218.04) 5545.86,2218.04 5547.19,2216.71 5573.96,2216.71 ; v1@5544.08,2221.93 ccw(c5556.69,2234.54) 5556.69,2216.71 ; v1@5576.41,2402.49 cw(c5585.8,2393.1) 5585.8,2406.37 cw(c5585.8,2419.65) v1@5576.41,2410.26 ; v1@5591.04,3619.02 ccw(c5599.93,3635.09) 5612.92,3622.1 ; 5594.19,3603.07 5594.19,3603.37 ; v1@5594.87,2612.6 cw(c5564.88,2578.89) C336.2@5610,2578.89 ; v1@5594.93,6073.89 ccw(c5585.54,6083.28) 5598.82,6083.28 ccw(c5612.1,6083.28) v1@5602.71,6073.89 ; v1@5594.93,6153.89 ccw(c5585.54,6163.28) 5598.82,6163.28 ccw(c5612.1,6163.28) v1@5602.71,6153.89 ; R119.2@5595.06,6110.75 cw(c5585.98,6101.67) 5598.82,6101.67 cw(c5611.66,6101.67) R119.2@5602.58,6110.75 ; R120.1@5595.06,6170.75 cw(c5585.98,6161.67) 5598.82,6161.67 cw(c5611.66,6161.67) R120.1@5602.58,6170.75 ; 5596.36,2384.21 cw(c5610,2370.56) C337.2@5610,2389.86 ; v1@5596.85,3629.52 ccw(c5607.96,3649.6) 5624.19,3633.37 ; v1@5598.52,2611.21 cw(c5598.52,2597.93) 5607.91,2607.32 cw(c5617.3,2616.71) v1@5604.02,2616.71 ; v1(5598.52,2616.71) 5610,2605.23 ; v1(5598.82,6070) R119.2@5598.82,6115 ; v1(5598.82,6150) R120.1@5598.82,6175 ; C337.2@5599.75,2406.37 cw(c5599.75,2386.3) C337.2@5614.57,2399.84 ; v1@5602.84,2621.56 cw(c5588.66,2605.62) 5610,2605.62 ; C339.2@5605.89,2004.78 ccw(c5595.97,2014.7) 5610,2014.7 ccw(c5624.03,2014.7) C339.2@5614.11,2004.78 ; C336.2@5605.89,2584.78 ccw(c5595.97,2594.7) 5610,2594.7 ccw(c5624.03,2594.7) C336.2@5614.11,2584.78 ; C336.2@5607.02,2586.1 cw(c5617.47,2567.05) 5632.82,2582.41 ; C339.2@5610,2000.67 5610,2024.04 5609,2025.04 5608.86,2025.04 ; C336.2@5610,2580.67 5610,2605.23 ; v4(5610,5470) 5679.21,5470 C256.2@5725.39,5516.18 ; 5610.44,2604.8 cw(c5593.23,2587.59) C336.2@5615.72,2578.31 ; v4@5614.11,5465.89 cw(c5624.03,5455.97) 5624.03,5470 cw(c5624.03,5484.03) v4@5614.11,5474.11 ; v1(5640.19,2764.37) 5625.86,2750.04 5581.86,2750.04 5573.52,2758.37 5540.19,2758.37 5481.02,2817.54 5480.19,2816.71 ; U63.2@5642.24,935 5680,935 5695,950 v1(5695,1045) ; 5642.6,2454 ccw(c5684.7,2496.1) C342.2@5701.59,2439.01 ; v1@5645.02,2066.71 cw(c5631.75,2066.71) 5641.14,2057.32 cw(c5650.52,2047.93) 5650.52,2061.21 cw(c5650.52,2047.93) 5659.91,2057.32 cw(c5669.3,2066.71) v1@5656.02,2066.71 ; v1@5652.66,2064.57 ccw(c5711.06,2122.97) C185.2@5711.06,2040.38 ; U63.2@5653.65,929.5 cw(c5666.93,916.22) 5666.93,935 cw(c5666.93,953.78) U63.2@5653.65,940.5 ; v1@5654.69,2062.54 cw(c5599.16,2007.01) C185.2@5677.69,2007.01 ; 5656.86,2439.73 ccw(c5691.21,2474.08) C342.2@5705,2427.5 ; 5669.28,2427.31 cw(c5648.98,2407.01) C342.2@5677.69,2407.01 ; 5671.13,2425.46 ccw(c5697.73,2452.06) C342.2@5708.4,2415.99 ; C185.2@5673.15,2044.08 ccw(c5711.06,2082) C185.2@5711.06,2028.38 ; C185.2@5675.18,2042.06 cw(c5640.13,2007.01) C185.2@5689.69,2007.01 ; v1(5682.52,3603.71) 5682.52,3616.04 5665.19,3633.37 5624.19,3633.37 ; v1(5683.03,1162.19) 5680.86,1164.37 5680.86,1180.04 ; v1@5686.82,1166.19 cw(c5699.94,1180.04) 5680.86,1180.04 ; 5690.02,1181.04 5681.86,1181.04 5680.86,1180.04 ; 5690.02,1181.35 5700.39,1191.71 C235.2@5700.39,1216.18 ; v4(5690,3351.71) v4@5690,3355 ; v1@5691.11,1041.11 cw(c5681.72,1031.72) 5695,1031.72 cw(c5708.28,1031.72) v1@5698.89,1041.11 ; v1@5692.64,1048.71 v1@5695,1046.35 ; C219.2@5696.01,1330.55 cw(c5722.94,1303.62) 5722.94,1341.71 ; C235.2@5696.28,1212.07 cw(c5686.36,1202.15) 5700.39,1202.15 cw(c5714.42,1202.15) C235.2@5704.5,1212.07 ; C219.2@5700.39,1326.18 5715.92,1341.71 v1(5756.86,1341.71) 5772.39,1326.18 C249.2@5840.39,1326.18 ; C219.2@5700.39,1331.99 ccw(c5700.39,1346.02) 5710.31,1336.1 ccw(c5720.23,1326.18) C219.2@5706.2,1326.18 ; C219.2@5704.5,1322.07 cw(c5751.91,1274.65) v1@5751.91,1341.71 ; C185.2@5715,2007.01 5710.22,2007.01 v1(5650.52,2066.71) 5608.86,2025.04 ; C342.2@5715,2407.01 5708.52,2407.01 5708.52,2408.37 5691.86,2425.04 5671.55,2425.04 5631.86,2464.74 5631.86,2583.37 5622.28,2592.95 5610,2605.23 ; C329.2@5719.55,3585.89 cw(c5709.96,3576.3) 5723.52,3576.3 ; C256.2@5719.58,5516.18 cw(c5705.55,5516.18) 5715.47,5506.26 cw(c5725.39,5496.34) C256.2@5725.39,5510.37 ; C255.2@5721.28,5622.07 cw(c5711.36,5612.15) 5725.39,5612.15 cw(c5739.42,5612.15) C255.2@5729.5,5622.07 ; 5723.52,3575.64 cw(c5738.02,3575.64) C329.2@5727.77,3585.89 ; C329.2@5723.66,3590 5723.52,3590 5723.52,3574.04 5772.52,3525.04 5829.19,3525.04 v1(5882.52,3578.37) ; C255.2@5725.39,5626.18 5725.39,5599.61 5730,5595 v4(5790,5595) ; R118.1@5735.06,6019.25 ccw(c5725.98,6028.33) 5738.82,6028.33 ccw(c5751.66,6028.33) R118.1@5742.58,6019.25 ; R118.1@5738.82,6015 5738.82,6057.67 v1@5739.52,6058.37 ; 5738.82,6039.37 cw(c5760.19,6039.37) v1@5745.08,6054.49 ; v1(5741.19,6058.37) v1@5739.52,6058.37 ; v1@5746.69,6058.37 cw(c5763.99,6058.37) 5751.76,6070.61 ; v1@5752.97,1337.82 ccw(c5743.58,1328.43) 5743.58,1341.71 ccw(c5743.58,1354.99) v1@5752.97,1345.6 ; 5763.41,6134.29 cw(c5783.31,6114.39) U20.2@5783.31,6142.54 ; 5768.63,6139.52 cw(c5778.12,6130.03) U20.2@5782.67,6142.65 ; 5772.26,6141.71 ccw(c5772.26,6155.46) U20.2@5781.98,6145.73 ; v4@5785.89,5590.89 ccw(c5775.97,5580.97) 5775.97,5595 ccw(c5775.97,5609.03) v4@5785.89,5599.11 ; U20.2@5792.17,6141.71 5770.82,6141.71 ; U20.2@5792.17,6144.41 5773.52,6144.41 5770.82,6141.71 ; v1(5795,5554.23) 5827.52,5554.04 5864.43,5554.04 ; v1@5798.87,5550.32 cw(c5808.2,5540.88) 5808.28,5554.16 cw(c5808.36,5567.43) v1@5798.91,5558.1 ; v1(5825.19,1633.37) 5857.24,1633.37 5882.24,1608.37 R160.2@5882.24,1590 ; v1@5829.08,1629.49 cw(c5838.47,1620.1) 5838.47,1633.37 cw(c5838.47,1646.65) v1@5829.08,1637.26 ; C250.2@5836.28,1212.07 cw(c5826.36,1202.15) 5840.39,1202.15 cw(c5854.42,1202.15) C250.2@5844.5,1212.07 ; C249.2@5836.28,1322.07 ccw(c5826.36,1312.15) 5826.36,1326.18 ccw(c5826.36,1340.21) C249.2@5836.28,1330.29 ; v1@5836.3,1128.93 ccw(c5826.91,1138.32) 5840.19,1138.32 ccw(c5853.47,1138.32) v1@5844.08,1128.93 ; v1(5840.19,1125.04) 5840.19,1183.18 5840.39,1183.37 C250.2@5840.39,1216.18 ; C226.2@5861.28,5520.29 ccw(c5851.36,5530.21) 5865.39,5530.21 ccw(c5879.42,5530.21) C226.2@5869.5,5520.29 ; C225.2@5861.28,5622.07 cw(c5851.36,5612.15) 5865.39,5612.15 cw(c5879.42,5612.15) C225.2@5869.5,5622.07 ; C226.2@5865.39,5516.18 C225.2@5865.39,5626.18 ; v1(5872.19,4797.04) 5891.67,4777.56 C293.2@5891.67,4770.41 ; v1@5877.02,3578.37 cw(c5863.75,3578.37) 5873.14,3568.99 cw(c5882.52,3559.6) v1@5882.52,3572.87 ; R160.2@5878.48,1594.25 ccw(c5869.39,1603.33) 5882.24,1603.33 ccw(c5895.08,1603.33) R160.2@5886,1594.25 ; v1@5882.52,3583.87 ccw(c5882.52,3597.15) 5891.91,3587.76 ccw(c5901.3,3578.37) v1@5888.02,3578.37 ; 5891.67,3587.52 5902.7,3598.56 5912.52,3608.37 5931.86,3608.37 5948.52,3625.04 ; U64.2@5892.24,935 5923.52,935 ; U64.2@5894.54,935 cw(c5894.54,887.72) v1@5927.97,921.15 ; U64.2@5903.65,929.5 cw(c5916.93,916.22) 5916.93,935 cw(c5916.93,953.78) U64.2@5903.65,940.5 ; R122.1@5912.42,6119.25 ccw(c5903.34,6128.33) 5916.18,6128.33 ccw(c5929.02,6128.33) R122.1@5919.94,6119.25 ; R121.1@5912.42,6170.75 cw(c5903.34,6161.67) 5916.18,6161.67 cw(c5929.02,6161.67) R121.1@5919.94,6170.75 ; R117.2@5916.18,6015 5964.23,6015 v1(5964.52,6014.71) ; R121.1@5916.18,6175 R122.1@5916.18,6115 5940.19,6115 v1(5945,6115) ; R117.2@5919.94,6011.24 cw(c5929.02,6002.16) 5929.02,6015 cw(c5929.02,6027.84) R117.2@5919.94,6018.76 ; R122.1@5919.94,6111.24 cw(c5929.02,6102.16) 5929.02,6115 cw(c5929.02,6127.84) R122.1@5919.94,6118.76 ; v1(5931.86,925.04) 5929.52,927.37 5929.52,929 5923.52,935 ; v1@5936.45,929.64 ccw(c5923.51,916.69) 5923.51,935 ; v1@5941.11,6111.11 ccw(c5931.72,6101.72) 5931.72,6115 ccw(c5931.72,6128.28) v1@5941.11,6118.89 ; 5950.54,6015 cw(c5950.54,6000.72) v1@5960.64,6010.82 ; 5951.95,6015 ccw(c5951.95,6027.28) v1@5960.64,6018.6 ; v1(5956.52,4479.04) 5980.96,4479.04 5990,4470 C319.2@5990,4446.89 ; v1@5960.41,4475.15 cw(c5969.8,4465.76) 5969.8,4479.04 cw(c5969.8,4492.32) v1@5960.41,4482.93 ; J30.GND2@5978.03,223.03 cw(c5937.06,182.06) 5995,182.06 cw(c6052.94,182.06) J30.GND2@6011.97,223.03 ; C321.2@5985.89,3810.89 cw(c5975.97,3800.97) 5990,3800.97 cw(c6004.03,3800.97) C321.2@5994.11,3810.89 ; C334.2@5985.89,4214.78 ccw(c5967.46,4233.21) v1@5993.52,4233.21 ; C319.2@5985.89,4451 ccw(c5975.97,4460.92) 5990,4460.92 ccw(c6004.03,4460.92) C319.2@5994.11,4451 ; v1(5987.19,4361.04) 5990.19,4364.04 v1@5990.19,4366.71 ; v1@5989.64,4235.82 cw(c5980.25,4226.43) 5993.52,4226.43 cw(c6006.8,4226.43) v1@5997.41,4235.82 ; C321.2@5990,3815 5990,3795 v1@6006.86,3778.14 ; C305.2@5990,3974.45 5990.19,3974.44 C305.2@5990.19,3974.71 ; C334.2@5990,4210.67 5993.52,4214.19 v1(5993.52,4239.71) ; v1@5991.11,172.38 ccw(c5981.72,181.77) 5995,181.77 ccw(c6008.28,181.77) v1@5998.89,172.38 ; J29.GND1@5991.12,2278.67 6043.86,2278.67 ; v1@5995,168.3 v1(5995,168.5) J30.GND2@5995,260 ; v1(6000,5540.19) 6000,5595 6015,5610 6070,5610 6113.31,5566.69 U60.1@6116.57,5566.69 ; v1@6004.5,3775 ccw(c5991.22,3775) 6000.61,3784.39 ccw(c6010,3793.78) v1@6010,3780.5 ; J29.GND1@6026.3,2266.25 cw(c6043.86,2260.05) 6043.86,2278.67 ; J29.GND1@6026.3,2291.09 ccw(c6043.86,2297.29) 6043.86,2278.67 ; 6043.86,2278.71 v1(6056.86,2291.71) ; 6115.9,4654.88 cw(c6143.96,4654.88) v1@6126.04,4676.48 ; 6131.86,4655.75 6130,4655.75 ; U14.34@6174.25,4655.75 6170,4655.75 6130,4655.75 ; 6181.9,4016.75 cw(c6215.19,3983.46) v1@6215.19,4030.54 ; v1@6186.52,3208.37 v1(6188.52,3206.37) ; 6191.52,4026.38 cw(c6205.83,4012.07) v1@6213.19,4030.92 ; U54.3@6198.29,6082.23 cw(c6188.37,6072.31) 6202.4,6072.31 cw(c6216.43,6072.31) U54.3@6206.51,6082.23 ; 6202.39,4037.24 cw(c6215.19,4024.43) v1@6215.19,4042.54 ; U54.3@6202.4,6100.12 6202.4,6057.6 6215.96,6044.04 v1(6256.52,6044.04) ; v1@6210.84,4039.41 cw(c6198.52,4048.96) 6198.52,4033.37 ; v1@6213.02,3809.04 ccw(c6199.75,3809.04) 6209.14,3818.43 ccw(c6218.52,3827.82) v1@6218.52,3814.54 ; v1(6215.19,4036.04) 6212.52,4033.37 6198.52,4033.37 ; v1(6218.52,3809.04) 6173.52,3854.04 6173.52,4008.37 6198.52,4033.37 ; C172.1@6221.56,6169.11 ccw(c6211.64,6179.03) 6225.67,6179.03 ccw(c6239.7,6179.03) 6229.78,6169.11 ccw(c6239.7,6179.03) 6239.7,6165 ; C172.1@6229.78,6160.89 cw(c6239.7,6150.97) 6239.7,6165 ; C172.1@6236.46,6165 ccw(c6236.46,6201.54) Y4.4@6262.3,6175.7 ; 6249.59,6165 cw(c6249.59,6139.68) Y4.4@6269.89,6154.82 ; v1@6252.64,6040.15 ccw(c6243.25,6030.76) 6243.25,6044.04 ccw(c6243.25,6057.32) v1@6252.64,6047.93 ; C168.2@6255.22,6210.89 ccw(c6245.3,6200.97) 6245.3,6215 ccw(c6245.3,6229.03) C168.2@6255.22,6219.11 ; C168.2@6259.33,6215 6240.67,6215 6225.67,6200 C172.1@6225.67,6165 ; Y4.4@6260.27,6147.65 ccw(c6225.67,6121.84) C172.1@6225.67,6165 ; v1@6260.3,6087.26 ccw(c6250.91,6096.65) 6264.19,6096.65 ccw(c6277.47,6096.65) v1@6268.08,6087.26 ; v1(6264.19,6083.37) 6264.19,6101.69 6277.5,6115 ; Y4.4@6264.19,6165 C172.1@6225.67,6165 ; Y4.4@6266.64,6133.95 cw(c6255.55,6115) 6277.5,6115 ; Y4.4@6277.5,6156.5 6277.5,6115 ; Y4.4@6288.36,6133.95 ccw(c6299.45,6115) 6277.5,6115 ; J29.6@6292.99,1366.37 cw(c6264.25,1337.63) 6304.9,1337.63 cw(c6345.54,1337.63) J29.6@6316.8,1366.37 ; J29.6@6304.9,1404.65 6304.9,1324.71 6331.56,1298.04 6537.19,1298.04 v1(6578.52,1339.37) 6578.52,1395.2 J29.3@6569.07,1404.65 ; Y4.2@6358.31,6013.65 ccw(c6330.79,6045) 6372.5,6045 ccw(c6414.22,6045) Y4.2@6386.69,6013.65 ; v1@6368.61,6041.3 cw(c6359.22,6031.92) 6372.5,6031.92 cw(c6385.78,6031.92) v1@6376.39,6041.3 ; Y4.2@6372.5,5993.5 v1@6372.5,6045 ; v1(6440.19,1008.37) 6458.37,1008.37 6518.78,1068.78 ; v1@6444.08,1004.49 cw(c6453.47,995.1) 6453.47,1008.37 cw(c6453.47,1021.65) v1@6444.08,1012.26 ; C174.1@6496.56,5910.89 cw(c6486.64,5900.97) 6500.67,5900.97 cw(c6514.7,5900.97) C174.1@6504.78,5910.89 ; v1@6496.78,5880.41 ccw(c6487.39,5889.8) 6500.67,5889.8 ccw(c6513.95,5889.8) v1@6504.56,5880.41 ; v1(6500.67,5876.52) C174.1@6500.67,5915 ; J30.3@6508.83,1088.39 cw(c6494.48,1068.78) 6518.78,1068.78 ; J30.3@6518.78,1128.35 6518.78,1068.78 ; J30.3@6528.72,1088.39 ccw(c6543.08,1068.78) 6518.78,1068.78 ; v1(6532.52,2245.37) 6548.86,2261.71 6612.52,2261.71 v2@6614.52,2259.71 ; v1@6532.52,2250.87 ccw(c6532.52,2264.15) 6541.91,2254.76 ccw(c6551.3,2245.37) v1@6538.02,2245.37 ; v1@6550.64,4646.15 cw(c6541.25,4636.76) 6554.52,4636.76 cw(c6567.8,4636.76) v1@6558.41,4646.15 ; v1(6554.52,4650.04) 6554.52,4630.48 6560.75,4624.25 6571.86,4624.25 ; J29.3@6562.38,1362.83 cw(c6551.74,1338.24) v1@6578.52,1338.24 ; J29.3@6567.15,1373.84 cw(c6559.65,1356.52) J29.3@6578.52,1356.52 ; 6571.86,4624.37 6571.86,4624.25 ; v1@6573.02,1339.37 cw(c6559.75,1339.37) 6569.14,1329.99 cw(c6578.52,1320.6) v1@6578.52,1333.87 ; v1@6574.64,1343.26 ccw(c6565.25,1352.65) 6578.52,1352.65 ccw(c6591.8,1352.65) v1@6582.41,1343.26 ; 6592.14,2261.71 cw(c6592.14,2234.54) v2@6611.35,2253.75 ; C173.1@6655.22,5910.89 cw(c6645.3,5900.97) 6659.33,5900.97 cw(c6673.36,5900.97) C173.1@6663.44,5910.89 ; U55.2@6657.24,6425 6681.86,6425 ; C173.1@6659.33,5915 6659.33,5815.67 6675,5800 v1(6705,5800) ; U55.2@6660.73,6421.55 ccw(c6669.4,6433.91) 6680.09,6423.23 ; U55.2@6667.62,6431.37 ccw(c6677.73,6445.79) 6690.19,6433.33 ; U55.2@6668.67,6419.51 cw(c6681.86,6406.4) 6681.86,6425 ; U55.2@6668.67,6430.49 ccw(c6681.86,6443.6) 6681.86,6425 ; v1@6672.93,4737.11 ccw(c6688.48,4752.67) 6688.48,4730.67 ; 6675.08,4624.25 cw(c6675.08,4596.6) v1@6694.64,4616.15 ; v1(6677.52,4741.71) 6677.52,4733.33 6680.19,4730.67 C77.2@6735,4730.67 6798.29,4667.37 6798.52,4667.37 6798.52,4658.08 6800.86,4655.75 U15.34@6845.59,4655.75 6885.19,4655.75 6887.52,4658.08 6887.52,4658.37 v1(6890.19,4658.37) ; v1@6681.41,4745.6 ccw(c6717.45,4781.64) 6717.45,4730.67 ; v1@6686.11,6496.11 cw(c6676.26,6486.26) 6690.19,6486.26 ; 6690.19,6487.18 cw(c6702.82,6487.18) v1@6693.89,6496.11 ; v1@6690.99,6500 6690.19,6499.2 6690.19,6433.33 ; J10.5@6690.99,6579.01 6695,6575 v1(6725,6575) ; v1(6698.52,4620.04) 6694.31,4624.25 U14.12@6619.41,4624.25 6571.86,4624.25 ; v1@6701.11,5796.11 ccw(c6691.72,5786.72) 6691.72,5800 ccw(c6691.72,5813.28) v1@6701.11,5803.89 ; v1@6721.11,6571.11 ccw(c6711.72,6561.72) 6711.72,6575 ccw(c6711.72,6588.28) v1@6721.11,6578.89 ; v5@6730.17,6043.59 cw(c6714.83,6028.25) 6736.52,6028.25 ; C71.2@6730.89,4403.81 cw(c6720.97,4393.89) 6735,4393.89 cw(c6749.03,4393.89) C71.2@6739.11,4403.81 ; C75.2@6730.89,4594.07 ccw(c6720.97,4603.99) 6735,4603.99 ccw(c6749.03,4603.99) C75.2@6739.11,4594.07 ; C77.2@6730.89,4726.56 ccw(c6720.97,4716.64) 6720.97,4730.67 ccw(c6720.97,4744.7) C77.2@6730.89,4734.78 ; v1(6731.86,1124.37) 6771.98,1124.37 J30.6@6775.95,1128.35 ; v1(6731.86,2370.71) 6754.29,2370.71 NT5.2@6770,2355 ; v1@6732.72,1124.37 ccw(c6732.72,1178.58) J30.6@6771.05,1140.25 ; v5@6733.52,6044.37 6736.52,6041.37 6736.52,6020.37 6740,6012 U56.28@6748.52,6008.37 ; C71.2@6735,4407.92 6735,4383.37 6735.19,4383.37 6748.52,4370.04 v1(6748.52,4335.04) ; C75.2@6735,4589.96 6735,4605 6745.04,4615.04 v1(6767.19,4615.04) ; C77.2@6735,4724.86 cw(c6735,4710.83) 6744.92,4720.75 cw(c6754.84,4730.67) C77.2@6740.81,4730.67 ; C73.2@6735,4830.04 6735,4825.93 6768.19,4792.74 v1(6768.19,4789.37) ; v1@6735.75,1120.49 cw(c6745.14,1111.1) 6745.14,1124.37 cw(c6745.14,1137.65) v1@6735.75,1128.26 ; v1@6735.75,2366.82 cw(c6745.14,2357.43) 6745.14,2370.71 cw(c6745.14,2383.99) v1@6735.75,2374.6 ; v1@6744.64,4338.93 ccw(c6735.25,4348.32) 6748.52,4348.32 ccw(c6761.8,4348.32) v1@6752.41,4338.93 ; 6751.9,1124.37 cw(c6751.9,1097.29) J30.6@6771.05,1116.44 ; 6756.42,4804.51 cw(c6741.29,4789.37) v1@6762.69,4789.37 ; 6762.32,2362.68 ccw(c6770,2370.36) NT5.2@6770,2359.5 ; v1@6763.3,4611.15 ccw(c6753.91,4601.76) 6753.91,4615.04 ccw(c6753.91,4628.32) v1@6763.3,4618.93 ; U56.28@6764.33,6007.05 6764.65,6006.73 6788.31,6006.73 6795,6000.04 ; NT7.2@6800,2355 6820,2375 v1(6845,2375) v1@6845.26,2374.74 ; NT7.2@6800,2359.5 ccw(c6800,2370.36) 6807.68,2362.68 ; v1@6841.11,2371.11 ccw(c6831.72,2361.72) 6831.72,2375 ccw(c6831.72,2388.28) v1@6841.11,2378.89 ; U15.34@6870.57,4655.75 ccw(c6870.57,4678) v1@6886.3,4662.26 ; R246.2@7058.44,5858.3 ccw(c7057.29,5874.14) R246.2@7069.3,5863.75 ; R246.2@7060.1,5853.11 C170.1@7100.67,5900 ; J30.GND1@7074.19,282.14 ccw(c7019.76,336.57) v1@7096.73,336.57 ; J30.GND1@7082.67,273.66 ccw(c7048.73,307.6) J30.GND1@7096.73,307.6 ; v1@7092.84,335.69 cw(c7083.45,326.3) 7096.73,326.3 cw(c7110.01,326.3) v1@7100.62,335.69 ; J29.GND2@7093.48,2278.67 7093.48,2313.48 v1(7125,2345) ; C170.1@7094.87,5899.58 cw(c7080.88,5898.57) 7091.49,5889.39 cw(c7102.1,5880.21) C170.1@7101.09,5894.2 ; J30.GND1@7096.46,254.06 J30.GND1@7096.73,254.33 v1(7096.73,339.58) ; J30.GND1@7096.73,306.29 ccw(c7142.89,306.29) J30.GND1@7110.25,273.66 ; v1@7096.73,335.26 ccw(c7171.86,335.26) J30.GND1@7118.73,282.14 ; J29.GND2@7104.1,2286.23 cw(c7127.29,2305.06) 7106.17,2326.17 ; J29.GND2@7113.42,2293.8 cw(c7137.68,2313.49) 7115.59,2335.59 ; v1@7119.5,2345 cw(c7106.22,2345) 7115.61,2335.61 cw(c7125,2326.22) v1@7125,2339.5 ; J29.GND2@7122.74,2301.36 cw(c7148.07,2321.92) v1(7125,2345) ; C171.2@7146.98,5969.56 cw(c7141.55,5954.04) v1@7157.99,5954.04 ; C171.2@7157.99,5963.13 ccw(c7178.13,5963.13) v1@7163.89,5948.89 ; C171.2@7157.99,6005 v1@7157.99,5954.04 ; C171.2@7169.01,5969.56 ccw(c7174.43,5954.04) v1@7157.99,5954.04 ; v1(7198.52,2941.71) 7425.86,2941.71 v1(7459.19,2975.04) ; v1@7202.41,2937.82 cw(c7211.8,2928.43) 7211.8,2941.71 cw(c7211.8,2954.99) v1@7202.41,2945.6 ; v1@7240.3,554.49 cw(c7230.91,545.1) 7244.19,545.1 cw(c7257.47,545.1) v1@7248.08,554.49 ; v1@7240.3,562.26 ccw(c7230.91,571.65) 7244.19,571.65 ccw(c7257.47,571.65) v1@7248.08,562.26 ; 7244.19,541.44 ccw(c7275.77,541.44) C94.2@7253.44,519.11 ; C94.2@7249.33,509.19 cw(c7249.33,495.16) 7259.25,505.08 cw(c7269.17,515) C94.2@7255.14,515 ; v1@7250.97,1327.26 ccw(c7241.23,1337) 7255,1337 ; v1(7254.86,1323.37) 7255,1323.52 NT4.2@7255,1350 ; v1(7255,320) J9.5@7304.02,320 ; 7255,1336.31 ccw(c7267.79,1336.31) v1@7258.75,1327.26 ; v1@7258.89,316.11 cw(c7268.28,306.72) 7268.28,320 cw(c7268.28,333.28) v1@7258.89,323.89 ; U19.14@7292.05,595.67 7260.67,595.67 7244.19,579.19 v1(7244.19,558.37) 7244.19,520.14 C94.2@7249.33,515 7271.14,493.19 7350.94,493.19 U18.2@7352.76,495 ; U15.12@7294.41,4624.25 7347.86,4624.25 7348.52,4624.92 7348.52,4625.04 ; C91.1@7311.56,994.11 ccw(c7301.64,1004.03) 7315.67,1004.03 ccw(c7329.7,1004.03) C91.1@7319.78,994.11 ; C91.1@7315.67,990 7315.67,1015.67 7322.37,1022.37 7365.19,1022.37 ; 7323.7,493.19 ccw(c7323.7,518.15) U18.2@7341.35,500.5 ; 7332.44,493.19 cw(c7332.44,480.59) U18.2@7341.35,489.5 ; v1@7342.64,4639.49 cw(c7328.42,4625.27) 7348.52,4625.27 ; v1(7346.52,4643.37) 7348.52,4641.37 7348.52,4625.04 ; 7366.17,4621.4 cw(c7334.73,4589.96) C74.2@7379.19,4589.96 ; C92.1@7375.22,994.11 ccw(c7365.3,1004.03) 7379.33,1004.03 ccw(c7393.36,1004.03) C92.1@7383.44,994.11 ; C92.1@7379.33,990 7379.33,1019.66 7376.62,1022.37 7365.19,1022.37 ; C76.2@7380.89,4403.81 cw(c7370.97,4393.89) 7385,4393.89 cw(c7399.03,4393.89) C76.2@7389.11,4403.81 ; C72.2@7380.89,4734.78 ccw(c7370.97,4744.7) 7385,4744.7 ccw(c7399.03,4744.7) C72.2@7389.11,4734.78 ; C78.2@7380.89,4875.49 ccw(c7370.97,4885.41) 7385,4885.41 ccw(c7399.03,4885.4) C78.2@7389.11,4875.49 ; 7381.86,1039.04 7365.19,1022.37 ; C76.2@7385,4407.92 7385,4391.71 7393.33,4383.37 7398.52,4383.37 7418.19,4363.71 v1(7418.19,4359.04) ; C74.2@7385,4589.96 7385,4602.37 7385.19,4602.37 ; C72.2@7385,4730.67 7385,4763.18 v1(7396.86,4775.04) 7456.86,4775.04 7473.52,4791.71 7473.52,4840.71 7469.52,4836.71 v1(7469.52,4836.6) ; C72.2@7385,4733.14 cw(c7438.76,4733.14) 7400.75,4771.15 cw(c7410.14,4761.76) 7410.14,4775.04 cw(c7410.14,4788.32) v1@7400.75,4778.93 ; 7385,4762.11 cw(c7409.79,4762.11) v1@7392.26,4779.64 ; C78.2@7385,4871.38 7385,4895.52 v1(7417.19,4927.71) ; C74.2@7390.81,4589.96 cw(c7434.35,4589.96) 7403.56,4620.75 ; 7405.5,4376.4 cw(c7388.15,4359.04) v1@7412.69,4359.04 ; v1@7411.69,4927.71 cw(c7398.41,4927.71) 7407.8,4918.32 cw(c7417.19,4908.93) v1@7417.19,4922.21 ; v1@7429.97,4672.15 cw(c7420.58,4662.76) 7433.86,4662.76 cw(c7447.14,4662.76) v1@7437.75,4672.15 ; v1(7431.86,1308.37) 7452.86,1329.37 7452.99,1329.37 C93.2@7452.99,1374 v1@7522.19,1374